# Altium PCB HLK-V20-KIT-V2.0.PcbDoc
Units mil, origin at the board's own origin, x right, y up, seen from the top; angles counter-clockwise.
Board outline 1181.1 x 1102.36 mil, 2 copper layers (Top Layer, Bottom Layer); 17 components, 58 nets, 93 pads, 18 vias.
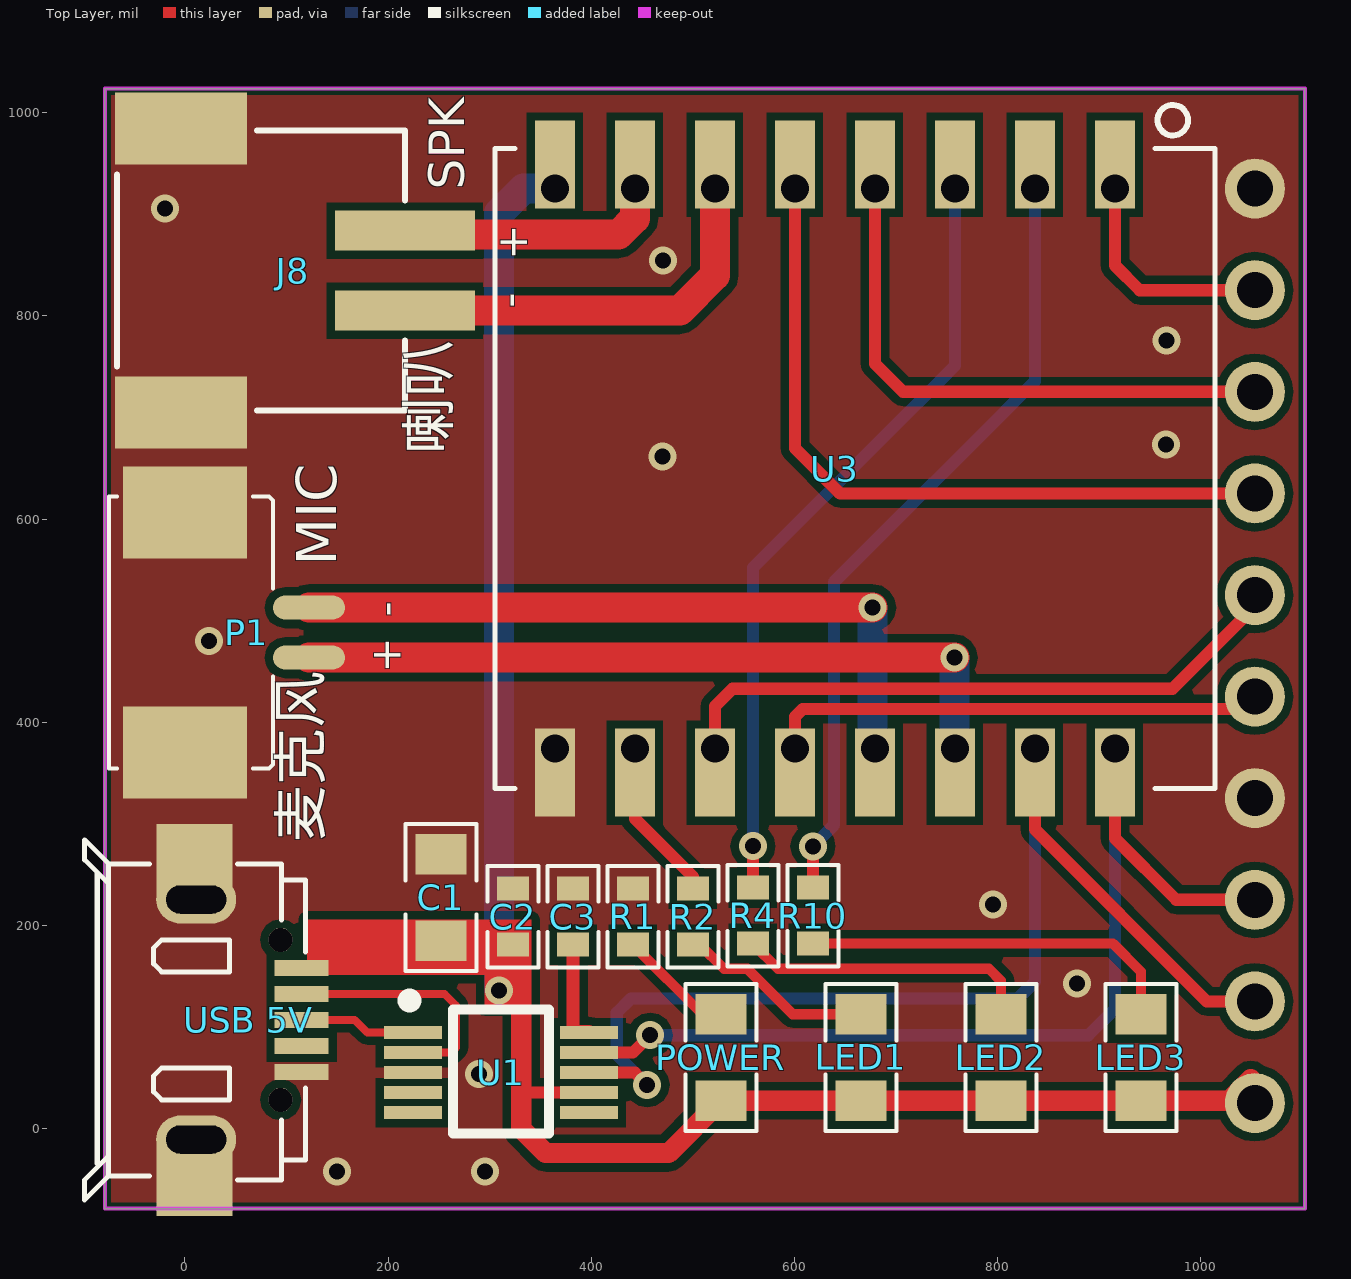
[diagram p0: Top Layer view]
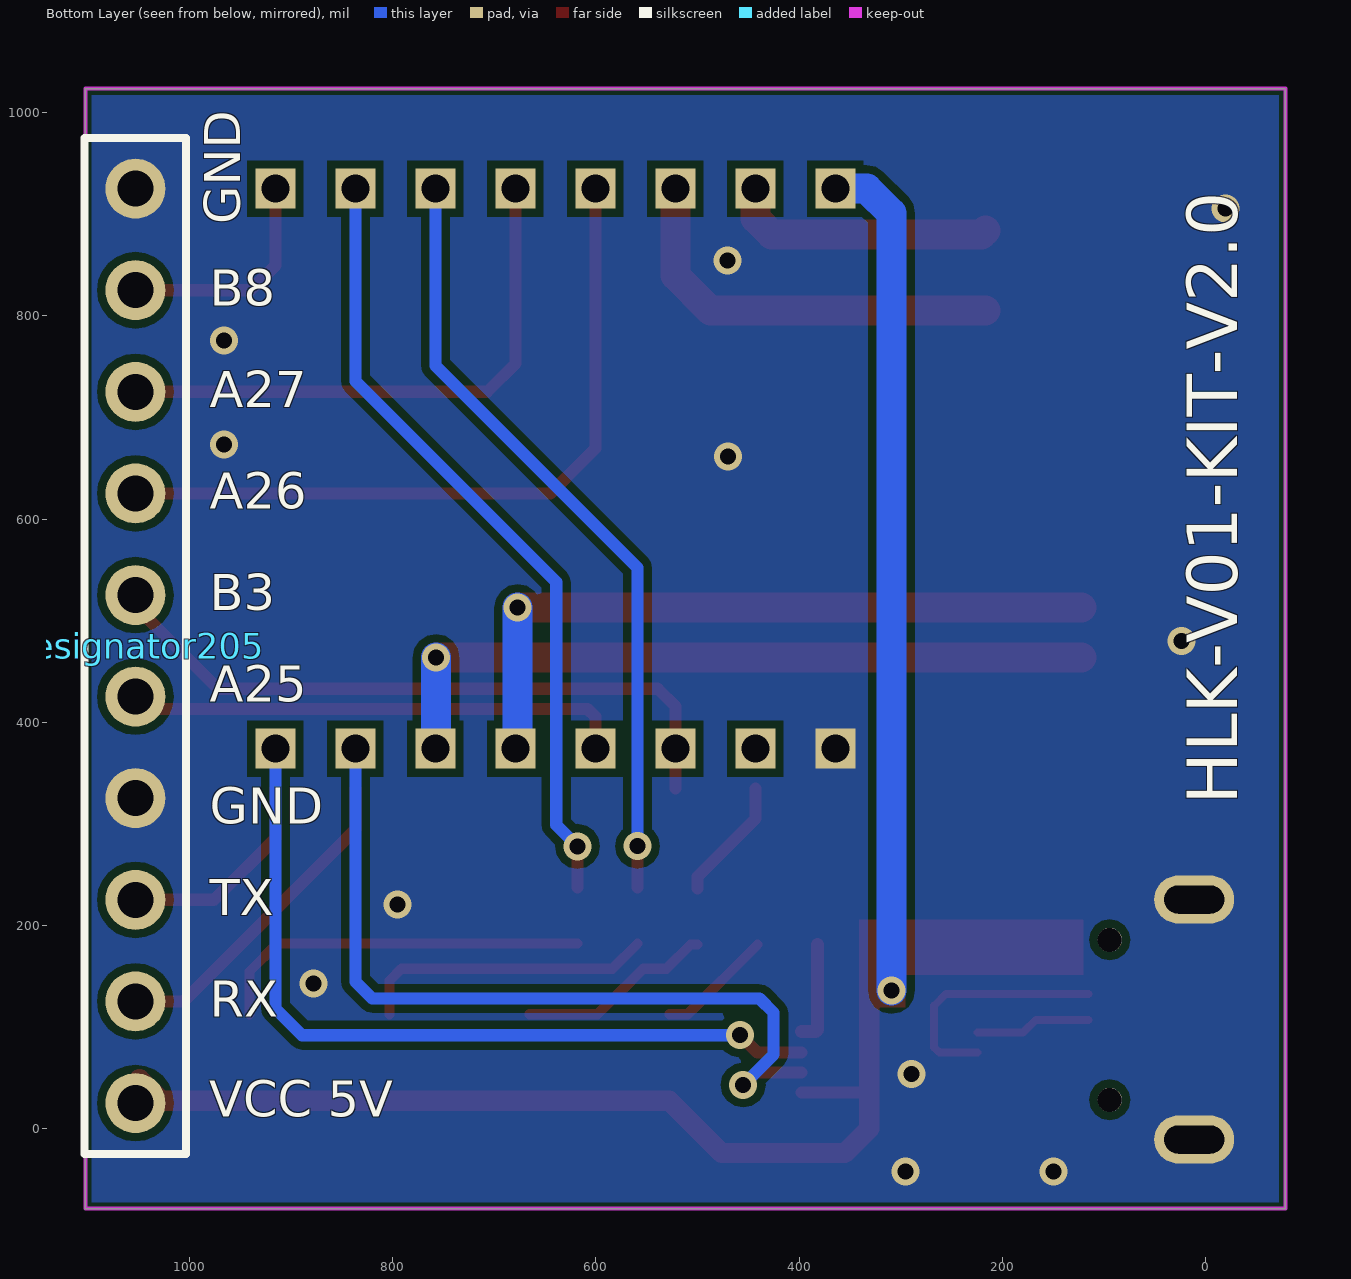
[diagram p1: Bottom Layer view, seen from below]

## Layer stack, top to bottom
Top Solder: solder mask 0.4, Solder Resist, Dk 3.5
Top Layer: signal copper 1.4
Dielectric1: dielectric 12.6, FR-4, Dk 4.8
Bottom Layer: signal copper 1.4
Bottom Solder: solder mask 0.4, Solder Resist, Dk 3.5

## Board outline
-78.74,-78.74 -78.74,1023.62 1102.36,1023.62 1102.36,-78.74

## Design rules (kind name [scope] priority, off if disabled: settings)
Clearance Clearance_1 [OnLayer('Keep-Out Layer')] p1: gap=3.94
Clearance [All] p2: gap=7.87
FabricationTestpoint [(IsPad And (OnTopLayer Or OnBottomLayer))] p1: side=3 testpointundercomponent=TRUE minsize=40 maxsize=100 preferedsize=60 minholesize=0 maxholesize=40 preferedholesize=32 testpointgrid=1 allowsidetop=TRUE allowsidebottom=TRUE usegrid=TRUE gridtolerance=0.01
PlaneConnect [All] p1: planeconnectstyle=Direct reliefexpansion=20 reliefentries=4 reliefconductorwidth=10 reliefairgap=10
PolygonConnect [All] p1: connectstyle=Direct reliefconductorwidth=10 reliefentries=4 polygonreliefangle="90 Angle" airgapwidth=10
RoutingVias [All] p1: holewidth=15.75 width=27.56 viastyle="Through Hole" minholewidth=15.75 minwidth=27.56 maxholewidth=15.75 maxwidth=27.56
SolderMaskExpansion [All] p1: expansion=4
Width [All] p1: maxlimit=196.85 minlimit=7.09 preferedwidth=10
27 further rules are at their usual default settings.

## Classes and differential pairs
component class HLK-V01-KIT-V1.0: C1 C2 LED1 LED2 LED3 P1 POWER R1 R2 R4 R10 R11 "USB 5V"

## Components (designator, comment, footprint, x,y, rotation, side; value= is the part's Value field where it differs from the comment)
C1 "4.7UF" 0805R 251.97,270.04 r270 top
C2 "0.1UF" 0603 322.83,208.66 r270 top
C3 "0.1UF" 0603 381.89,208.66 r270 top
Designator205 "Comment" HDR1X10 1053.15,925.2 r270 bottom locked
J8 "SPK" PH2.0-2P 216.54,805.12 r90 top
LED1 "LED2" 0805R 665.35,27.56 r90 top
LED2 "LED2" 0805R 803.15,27.56 r90 top
LED3 "LED3" 0805R 940.94,27.56 r90 top
P1 "1*1.27mm" 1.25-2P 122.05,488.19 r90 top locked
POWER "LED" 0805R 527.56,27.56 r90 top
R1 "1K" 0603 440.94,208.66 r90 top
R2 "1K" 0603 500,208.66 r90 top
R4 "1K" 0603 559.06,209.66 r90 top
R10 "1K" 0603 618.11,209.66 r90 top
U1 "CH340E" MSOP-10 311.02,55.12 r270 top
U3 "Comment" HLK-V20 915.35,964.57 r270 top
"USB 5V" "USB" usb 7.87,106.3 r270 top locked (schematic designator USB1)

## Footprints (in the part's own frame and the unit in brackets; to place one, negate y for a bottom-side part, rotate by r counter-clockwise, add the part's x,y. Pads: shape width x height; smd on the part's side, far side on the other; paste and mask are expansions set on the pad)
1.25-2P [mm]
  oval 0.6x1.8 smd: 1(0.625,0) 2(-0.625,0)
  rect 2.3x3.1 smd: 3(-3,3.1) 4(3,3.1)
  silkscreen extent -3.4,0.9 3.4,5
0603 [mm]
  rect 0.6x0.8 smd: 1(-0.7,0) 2(0.7,0)
  silkscreen extent -1.27,-0.64 1.27,0.64
0805R [mil]
  rect 40x50 smd: 1(0,0) 2(85,0)
  silkscreen extent -30,-35 115,35, body extent 4,-25 83,25, height 22
HDR1X10 [mm]
  round 1.5 hole 0.9: 1(0,0) 2(2.54,0) 3(5.08,0) 4(7.62,0) 5(10.16,0) 6(12.7,0) 7(15.24,0) 8(17.78,0) 9(20.32,0) 10(22.86,0)
  silkscreen extent -1.27,-1.27 24.13,1.27
HLK-V20 [mm]
  rect 1.4x1 smd: 1(0,0) 2(0,-2) 3(0,-4) 4(0,-6) 5(0,-8) 6(0,-10) 7(0,-12) 8(0,-14) 9(16,-14) 10(16,-12) 11(16,-10) 12(16,-8) 13(16,-6) 14(16,-4) 15(16,-2) 16(16,0)
  rect 1x1 hole 0.7: 1(1,0) 2(1,-2) 3(1,-4) 4(1,-6) 5(1,-8) 6(1,-10) 7(1,-12) 8(1,-14) 9(15,-14) 10(15,-12) 11(15,-10) 12(15,-8) 13(15,-6) 14(15,-4) 15(15,-2) 16(15,0)
  silkscreen extent -1.09,-15.5 16,2.5
MSOP-10 [mm]
  rect 0.33x1.45 smd: 1(-1,-2.2) 2(-0.5,-2.2) 3(0,-2.2) 4(0.5,-2.2) 5(1,-2.2) 6(1,2.2) 7(0.5,2.2) 8(0,2.2) 9(-0.5,2.2) 10(-1,2.2)
  silkscreen extent -1.95,-2.44 1.53,1.2
PH2.0-2P [mm]
  rect 1x3.5 smd: 1(0,0) 2(2,0)
  rect 1.8x3.3 smd: 3(4.55,5.6) 4(-2.55,5.6)
  silkscreen extent -2.5,0 4.5,7.2
usb [mm]
  oval 1.2x2 hole 0.7 slot 1.5 at 90 deg: 1(-3.028,0.081) 1(2.972,0.081)
  rect 0.4x1.35 smd: 1(1.28,2.719) 2(0.63,2.719) 3(-0.02,2.719) 4(-0.67,2.719) 5(-1.32,2.719)
  round 0.6 hole 0.6: 6(1.98,2.194) 9(-2.02,2.194)
  rect 1.8x1.9 smd: 7(3.98,0.044) 8(-4.02,0.044)
  silkscreen extent -4.52,-2.71 4.48,2.82

## Part data
C1 C2 C3: library part CAP, "Capacitor"
LED1 LED2 LED3: library part LED
P1: library part Component_1
R1 R2 R4 R10: library part RES1
"USB 5V": library part USB-B

## Via types
v1: diameter 27.56, hole 15.75, Top Layer to Bottom Layer, tented both sides, 18 vias

## Nets (pads, with @x,y where several pads share a name; then routed paths per layer and width w, separated by ;. In a path a pad name is that pad's centre, name@x,y a point inside that pad or via, vN(x,y) a via of type N, cw(c..) or ccw(c..) an arc to the next point about the centre after c; other vN are vias at no path point)
3.3V: 
5V: "USB 5V.5" C1.2 C2.2 Designator205.10 LED1.1 LED2.1 LED3.1 POWER.1 U1.7 U3.8 | length 1947.6
  Top Layer w10: 333,54 333,164
  Top Layer w12: 333,35.43 U1.7
  Top Layer w20: C2.2 331,172.94 331,0 355,-24 476,-24 POWER.1 LED1.1 LED2.1 LED3.1 1027.95,27.56 Designator205.10@1049.21,48.82
  Bottom Layer w29.53: v1(309,136) 309,901 333.2,925.2 U3.8@364.17,925.2
ACE_N: 
ACE_P: 
CTS: U1.5
DM: "USB 5V.4" U1.2 | length 242.7
  Top Layer w7.87: 114.91,132.68 255.32,132.68 267,121 267,80 261.8,74.8 U1.2
DP: "USB 5V.3" U1.1 | length 114.7
  Top Layer w7.87: 114.91,107.09 166.91,107.09 179.51,94.49 U1.1
GND: "USB 5V.1" "USB 5V.7" "USB 5V.8" C1.1 C2.1 C3.1 Designator205.1 Designator205.7 J8.3 J8.4 P1.3 P1.4 R1.2 U1.3 U3.9
  other v1: 149.61,-42.22 295.28,-42.22 289.32,54 877.95,142.97 795.28,220.47 23.62,479.9 469.85,661.42 965.8,673.23 966.14,775.59 470.47,854.33 -19.69,905.51
IO9: 
IO10: 
IO11: 
MIC0_N: 
MIC0_P: 
MIC+: P1.2 U3.14 | length 725.1
  Top Layer w29.53: P1.2 v1(757.29,463.58)
  Bottom Layer w29.53: v1(757.29,463.58) 757.29,374.6 U3.14@757.87,374.02
MIC-: P1.1 U3.13 | length 694.6
  Top Layer w29.53: P1.1 v1(676.93,512.8)
  Bottom Layer w29.53: v1(676.93,512.8) 676.93,376.22 U3.13@679.13,374.02
NetC3_2: C3.2 U1.10 | length 100.3
  Top Layer w12.99: C3.2 381.89,97.11 383.33,95.67 U1.10@397.64,95.67
NetCHRX_1: 
NetCHTX_1: 
NetLED1_2: LED1.2 R2.1 | length 193.7
  Top Layer w10: R2.1 506.9,181.1 530.59,157.41 553.45,157.41 598.31,112.56 LED1.2
NetLED2_2: LED2.2 R4.1 | length 292.3
  Top Layer w10: R4.1 583.74,157.41 791.41,157.41 803.15,145.67 LED2.2
NetLED3_2: LED3.2 R10.1 | length 376.3
  Top Layer w10: R10.1 913.59,182.1 940.94,154.74 LED3.2
NetON/OFF_2: 
NetP1_1: 
NetP1_2: 
NetP2_1: 
NetP2_2: 
NetPOWER_2: POWER.2 R1.1 | length 115
  Top Layer w10: R1.1 509.49,112.56 POWER.2
NetR3_1: 
NetR10_2: 
NetR12_1: 
NetRST_2: 
PA_N: 
PA_P: 
PWM0: 
RTS: U1.4
RX0_CH340E: 
RXD: 
SIO0: 
SIO1: 
SPK+: J8.2 U3.7 | length 263.9
  Top Layer w29.53: J8.2 220.39,880 427,880 442.91,895.91 U3.7@442.91,925.2
SPK-: J8.1 U3.6 | length 405
  Top Layer w29.53: J8.1 487.12,805.12 521.65,839.65 U3.6@521.65,925.2
TCK/IO4: 
TDI/IO7: 
TDO/IO6: 
TMS/IO5: 
TX0_CH340E: 
TXD: 
UART_RX: Designator205.9 U1.8 U3.15 | length 1126.4
  Top Layer w12: U1.8 442.88,55.12 v1(455,43) ; U3.15@836.61,334.65 836.61,294.39 1005.8,125.2 Designator205.9
  Bottom Layer w12: v1(455,43) 425,73 425,114 439,128 820,128 836.61,144.61 U3.15@836.61,374.02
UART_TX: Designator205.8 U1.9 U3.16 | length 1003.4
  Top Layer w12: U1.9 440.8,74.8 v1(458,92) ; U3.16@915.35,334.65 915.35,285.65 975.8,225.2 Designator205.8
  Bottom Layer w12: v1(458,92) 889.24,92 915.35,118.11 U3.16@915.35,374.02
US_GPIO_B2: R2.2 U3.10 | length 122.1
  Top Layer w12: U3.10@442.91,334.65 442.91,305.09 500,248 R2.2
US_GPIO_B3: Designator205.5 U3.11 | length 664.3
  Top Layer w12: U3.11@521.65,334.65 521.65,415.65 539,433 972,433 1053.15,514.15 Designator205.5
US_GPIO_B6: R4.2 U3.3 | length 770.3
  Top Layer w12: R4.2 v1(559.06,277.94)
  Bottom Layer w12: v1(559.06,277.94) 559.06,552.06 757.87,750.87 U3.3@757.87,925.2
US_GPIO_B7: R10.2 U3.2 | length 778.5
  Top Layer w12: R10.2 v1(618.11,277.83)
  Bottom Layer w12: v1(618.11,277.83) 639,298.72 639,538 836.61,735.61 U3.2@836.61,925.2
US_GPIO_B8: Designator205.2 U3.1 | length 223.5
  Top Layer w12: U3.1@915.35,925.2 915.35,849.65 939.8,825.2 Designator205.2
US_SPIM_CLK: Designator205.4 U3.5 | length 726.7
  Top Layer w12: U3.5@600.39,925.2 600.39,669.61 644.8,625.2 Designator205.4
US_SPIM_MISO: Designator205.6 U3.12 | length 499.4
  Top Layer w12: U3.12@600.39,374.02 600.39,405.39 608.13,413.13 1053.15,413.13 Designator205.6
US_SPIM_MOSI: Designator205.3 U3.4 | length 557.8
  Top Layer w12: U3.4@679.13,925.2 679.13,752.87 706.8,725.2 Designator205.3
VMIC: 
pads on no net: "USB 5V.2" "USB 5V.6" "USB 5V.9" U1.6

## Polygon pours and split planes (outlines as drawn)
GND on Top Layer "MidLayer1-No Net" (solid, remove dead copper, pour order 4): -78.74,-78.74 1102.36,-78.74 1102.36,1023.62 -78.74,1023.62
GND on Bottom Layer "MidLayer1-No Net" (solid, remove dead copper, pour order 6): -78.74,-78.74 1102.36,-78.74 1102.36,1023.62 -78.74,1023.62

## Keep-outs
Keep-Out Layer:
  the board outline again, w3.94

## Other copper
Top Layer:
  rectangle net 5V: 295,119 341,151
  rectangle net 5V: 120,151 341,206

## Silkscreen, mask and mechanical layers (free items; w line width, h text height)
Top Overlay:
  text "+" at 311.02,889.76 h30 r270
  text "-" at 311.02,822.83 h30 r270
  text "喇叭" at 273,664 h70 r90
  text "MIC" at 149,554 h39.37 r90
  text "-" at 212.6,503.94 h30 r90
  text "+" at 212.6,448.82 h30 r90
  text "麦克风" at 147,282 h70 r90
Bottom Overlay:
  text "GND" at 950,890 h35.43 r270
  text "B8" at 980,810 h35.43
  text "A27" at 980,710 h35.43
  text "A26" at 980,610 h35.43
  text "B3" at 980,510 h35.43
  text "A25" at 980,420 h35.43
  text "HLK-V01-KIT-V2.0" at -31.5,318.9 h50 r270
  text "GND" at 980,300 h35.43
  text "TX" at 980,210 h35.43
  text "RX" at 980,110 h35.43
  text "VCC 5V" at 980.31,11.81 h35.43